# Altium PCB BRD9057A_SiWx917M_4-Layer_ExtSw_REF_DES_A01.PcbDoc (part 1 of 3)
Units mm, origin at the board's own origin, x right, y up, seen from the top; angles counter-clockwise.
Board outline 30 x 45 mm, 4 copper layers (Top Layer, Signal Layer 2, Signal Layer 3, Bottom Layer), stack 1.527 mm thick; 95 components, 97 nets, 386 pads, 413 vias.
Unrouted connection lines stored in the file: 15.
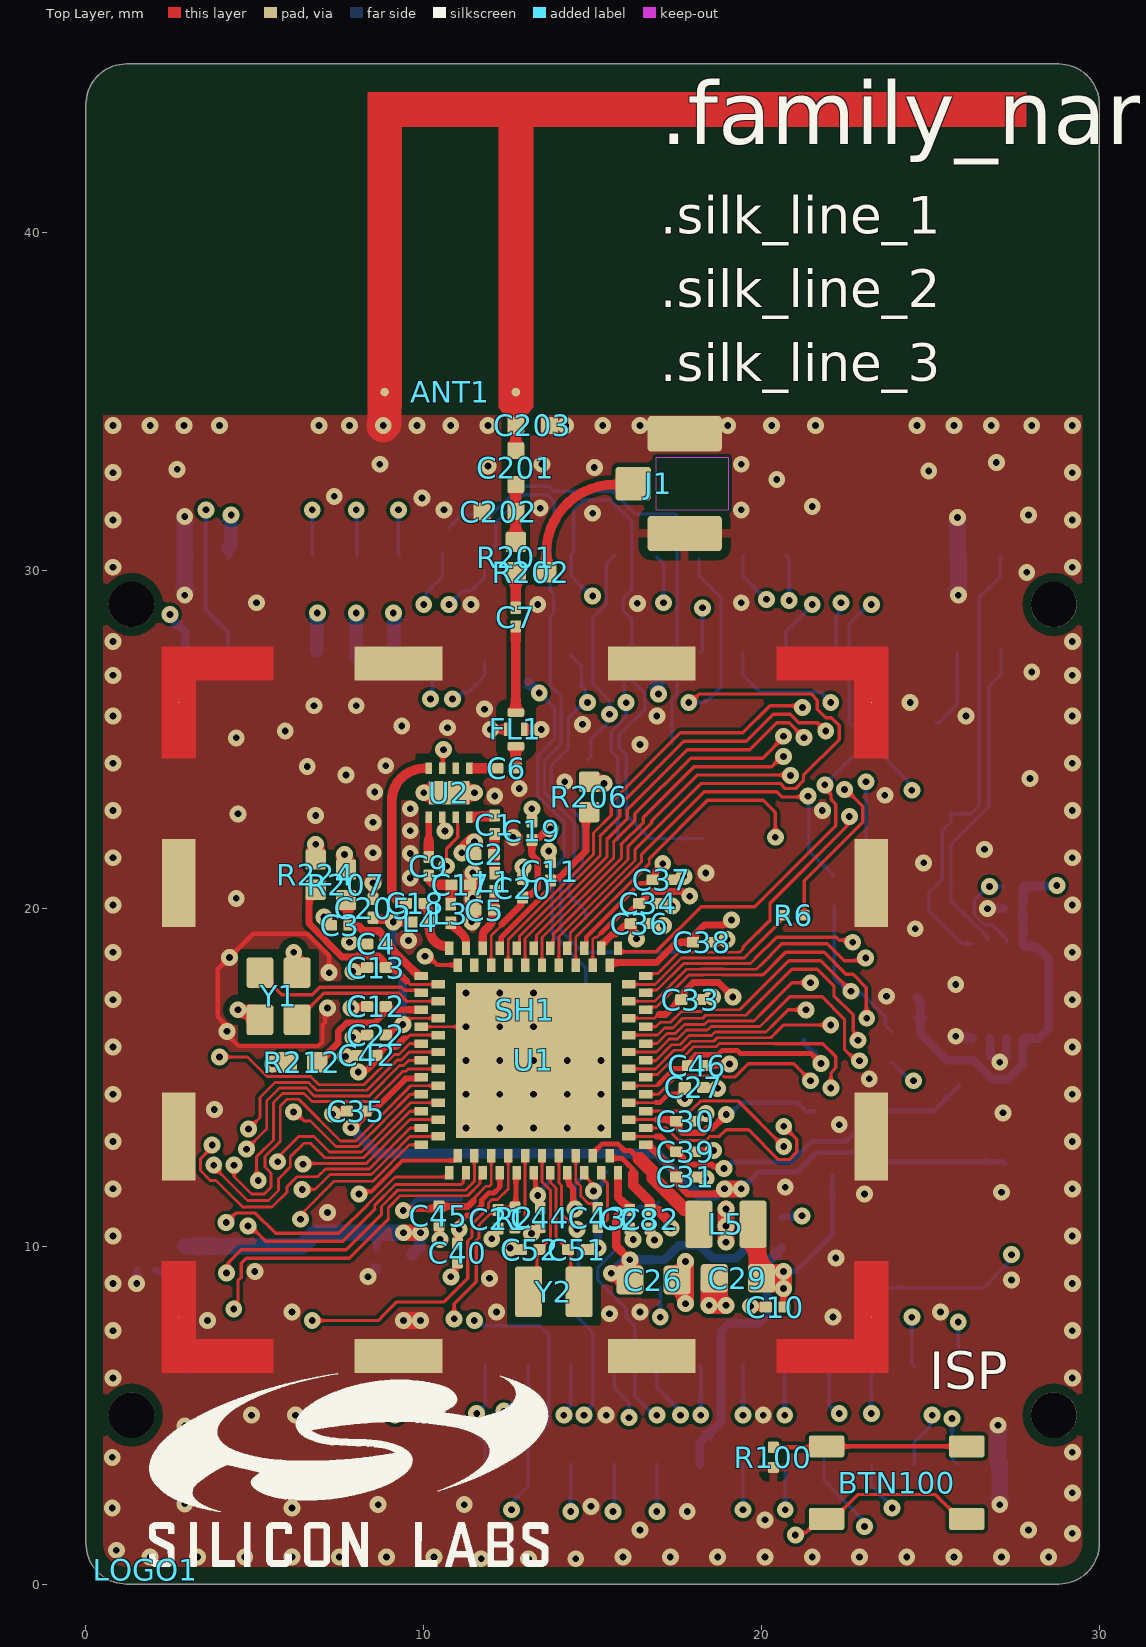
[diagram p0: Top Layer view]
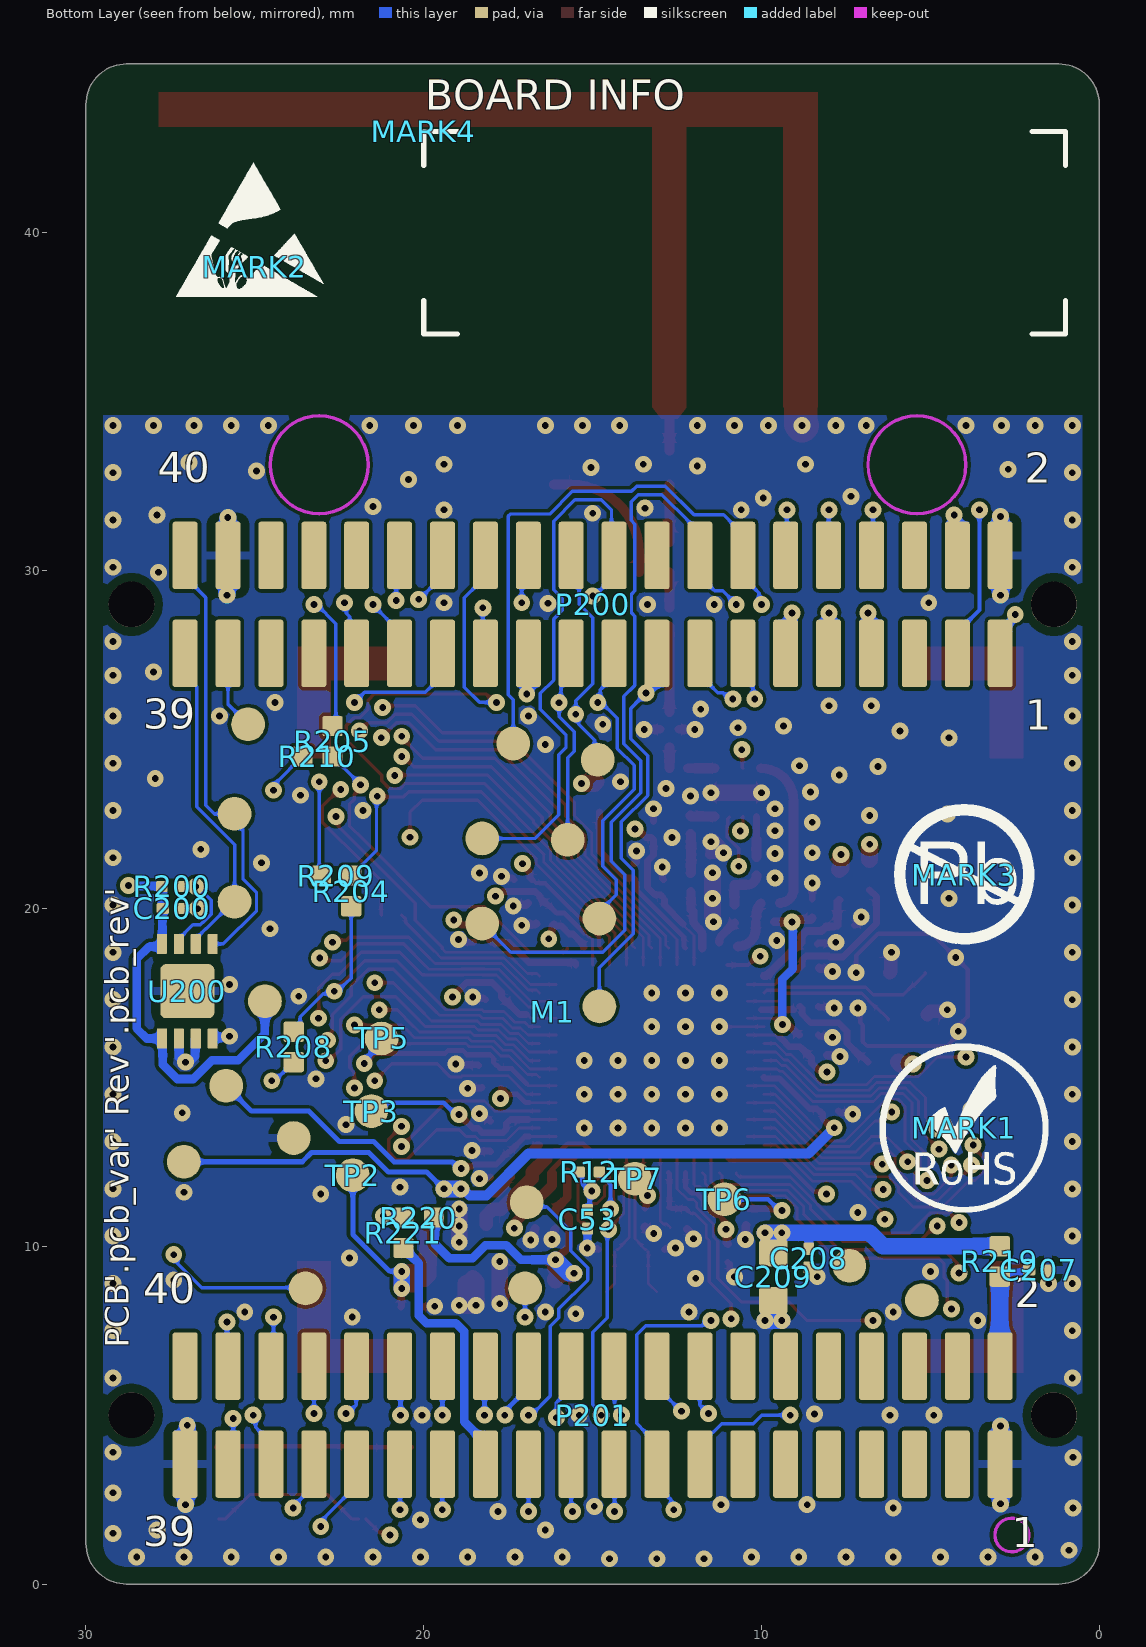
[diagram p1: Bottom Layer view, seen from below]
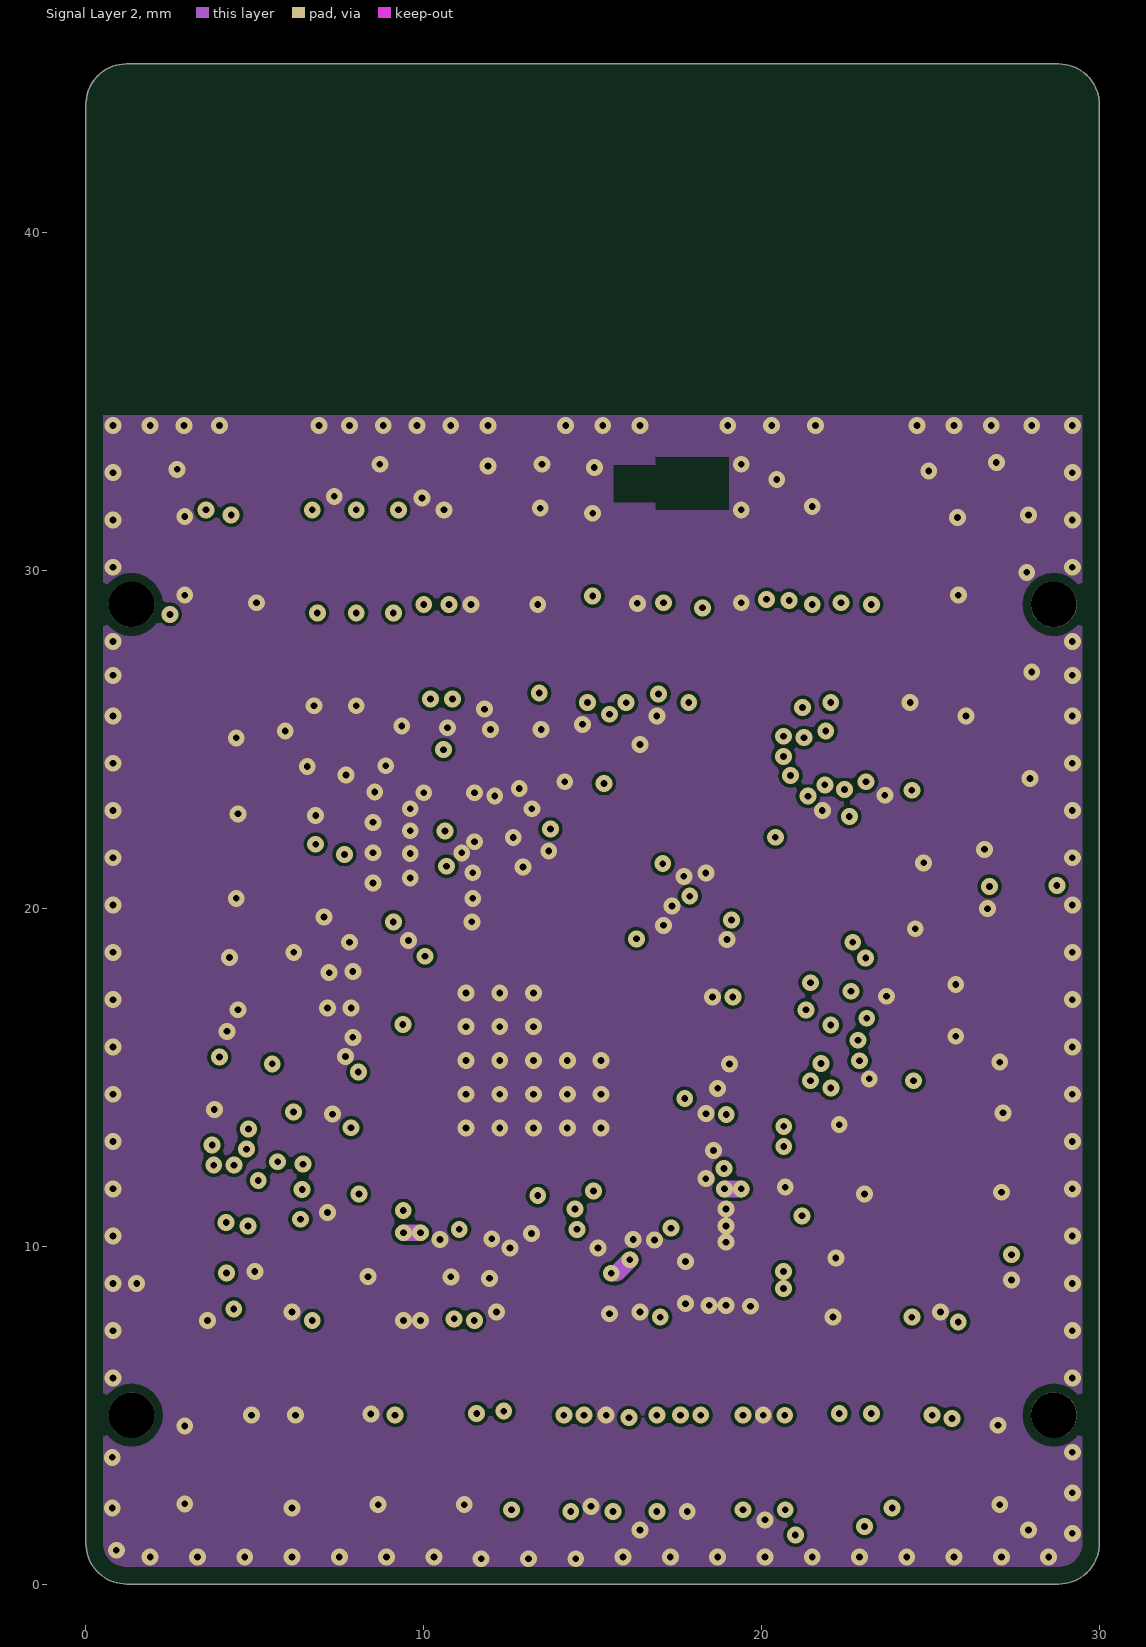
[diagram p2: Signal Layer 2]
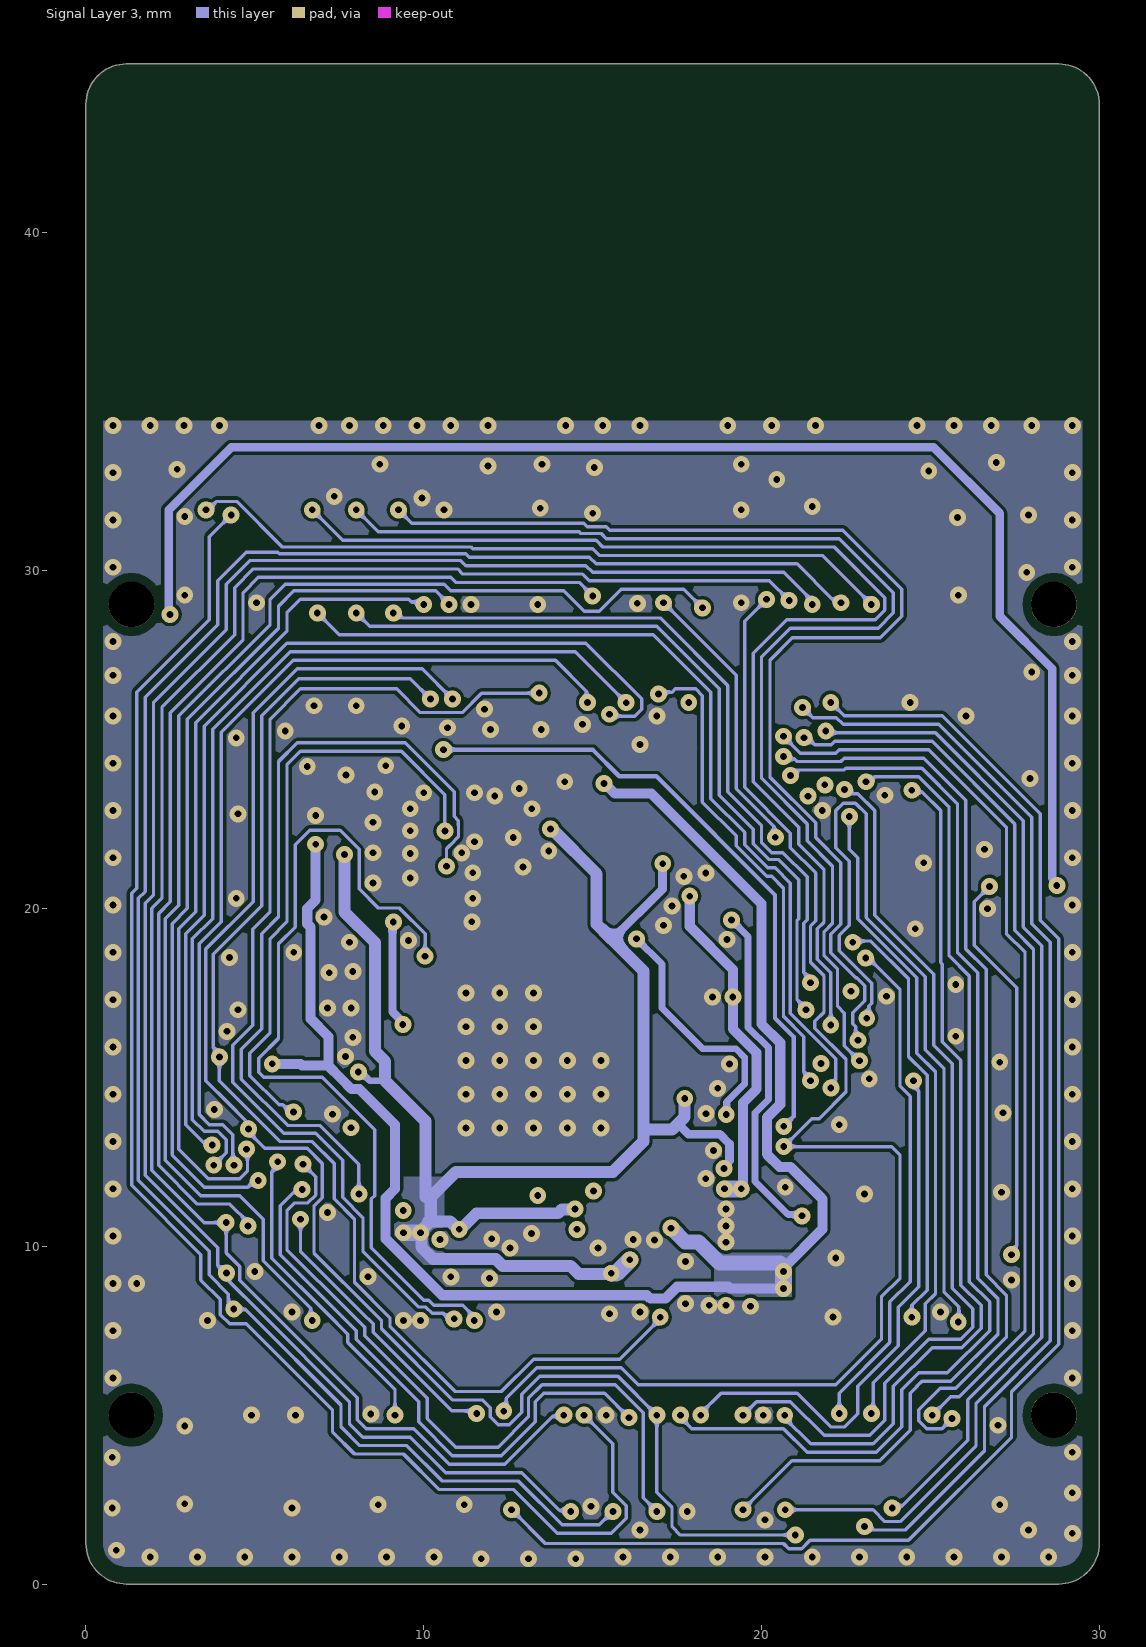
[diagram p3: Signal Layer 3]

## Layer stack, top to bottom
Top Solder: solder mask 0.0102, Solder Resist, Dk 3.5
Top Layer: signal copper 0.035
Dielectric 1: prepreg 0.1785, Dk 4.56
Signal Layer 2: signal copper 0.035
Dielectric 3: core 1.03, Dk 4.6
Signal Layer 3: signal copper 0.035
Dielectric 2: prepreg 0.1785, Dk 4.56
Bottom Layer: signal copper 0.035
Bottom Solder: solder mask 0.0102, Solder Resist, Dk 3.5

## Board outline
0,1.2 0,43.8 cw(c1.2,43.8) 1.2,45 28.8,45 cw(c28.8,43.8) 30,43.8 30,1.2 cw(c28.8,1.2) 28.8,0 1.2,0 cw(c1.2,1.2)

## Design rules (kind name [scope] priority, off if disabled: settings)
AcuteAngle [All] p1: minimum=6.00000000000000E+0001 checktracksonly=FALSE
AssemblyTestPointUsage [All] p1 off:
AssemblyTestpoint [All] p1 off: testpointundercomponent=TRUE minsize=1.016 maxsize=2.54 preferedsize=1.524 minholesize=0 maxholesize=1.016 preferedholesize=0.813 testpointgrid=0.025 usegrid=TRUE gridtolerance=0 allowsidetop=TRUE allowsidebottom=TRUE
BoardOutlineClearance [All] p1: gap=0.5 ignorepadtopadclearanceinfootprint=FALSE
Clearance Clearance_IFA_internal [InComponent('ANT1')] p1: gap=0.1 ignorepadtopadclearanceinfootprint=FALSE except(0: Arc-Fill Arc-Poly Arc-Region Track-Fill Track-Poly Track-Region SMDPad-Fill SMDPad-Poly SMDPad-Region)
Clearance Clearance_RF [InNetClass('50OHM')] p2: gap=0.127 ignorepadtopadclearanceinfootprint=FALSE except(0.1: SMDPad-SMDPad)
Clearance Clearance_NPTH [(ObjectKind = 'Pad') And (Layer = 'MultiLayer') And (PadIsPlated = 'False')] p3: gap=0.254 ignorepadtopadclearanceinfootprint=FALSE except(0: Arc-Hole Track-Hole SMDPad-Hole THPad-Hole Via-Hole Fill-Hole Poly-Hole Region-Hole Text-Hole)
Clearance Clearance_Polygon [InPoly] p4: gap=0.1 ignorepadtopadclearanceinfootprint=FALSE except(0: Arc-Hole Track-Hole SMDPad-Hole THPad-Hole Via-Hole Fill-Hole Poly-Hole Region-Hole Text-Hole)
Clearance Clearance_U1 [WithinRoom('Room_U1_Escape') vs OnLayer('Top Layer')] p5: gap=0.083 ignorepadtopadclearanceinfootprint=FALSE except(0: Arc-Hole Track-Hole SMDPad-Hole THPad-Hole Via-Hole Fill-Hole Poly-Hole Region-Hole Text-Hole)
Clearance Clearance_default [All] p6: gap=0.1 ignorepadtopadclearanceinfootprint=FALSE except(0: Arc-Hole Track-Hole SMDPad-Hole THPad-Hole Via-Hole Fill-Hole Poly-Hole Region-Hole Text-Hole)
ComponentClearance "ComponentClearance - Default - DEFAULT" [All] p1 off: gap=0.152 collisioncheckmode=3 verticalgap=0.254 showdistances=FALSE
FabricationTestPointUsage [All] p1 off: valid=0 allowmultiple=FALSE
FabricationTestpoint [All] p1 off: side=3 testpointundercomponent=TRUE minsize=1.016 maxsize=2.54 preferedsize=1.524 minholesize=0 maxholesize=1.016 preferedholesize=0.813 testpointgrid=0.025 allowsidetop=TRUE allowsidebottom=TRUE usegrid=TRUE gridtolerance=0
FanoutControl Fanout_BGA [IsBGA] p1 off: bgadir=Out bgaviamode=Centered fanoutstyle=Auto fanoutdirection=Alternating viagrid=0.025 // Fanout_BGA (Default Rule)
FanoutControl Fanout_LCC [IsLCC] p2 off: bgadir=Out bgaviamode=Centered fanoutstyle=Auto fanoutdirection=Alternating viagrid=0.025 // Fanout_LCC (Default Rule)
FanoutControl Fanout_SOIC [IsSOIC] p3 off: bgadir=Out bgaviamode=Centered fanoutstyle=Auto fanoutdirection=Alternating viagrid=0.025 // Fanout_SOIC (Default Rule)
FanoutControl Fanout_Small [(CompPinCount < 5)] p4 off: bgadir=Out bgaviamode=Centered fanoutstyle=Auto fanoutdirection=OutThenIn viagrid=0.025 // Fanout_Small (Default Rule)
FanoutControl Fanout_Default [All] p5 off: bgadir=Out bgaviamode=Centered fanoutstyle=Auto fanoutdirection=Alternating viagrid=0.025 // Fanout_Default (Default Rule)
HoleSize [All] p1: absolutevalues=TRUE maxlimit=12.7 minlimit=0.1 maxpercent=80.000 minpercent=20.000
HoleToHoleClearance [All] p1: gap=0.28 allowstackedmicrovias=TRUE
MinimumAnnularRing [All] p1: minimumring=0.15
MinimumSolderMaskSliver MinimumSolderMaskSliver_Components [All vs InComponent('U1')or InComponent('U200')or InComponent('U201')or InComponent('U2')  or InComponent('FL1')] p1: minsoldermaskwidth=0
MinimumSolderMaskSliver MinimumSolderMaskSliver_Foorprints [HasFootprint('C0201_GM') or HasFootprint('R0201') or HasFootprint('COIL_0201_GM')] p2: minsoldermaskwidth=0
MinimumSolderMaskSliver [All] p3: minsoldermaskwidth=0.1
PlaneClearance [All] p1 off: clearance=0.508
PlaneConnect [All] p1 off: planeconnectstyle=Relief reliefexpansion=0.508 reliefentries=4 reliefconductorwidth=0.254 reliefairgap=0.254
PolygonConnect PolygonConnect_P1 [InComponent('P1')] p1: connectstyle=Relief reliefconductorwidth=0.5 reliefentries=4 polygonreliefangle="90 Angle" airgapwidth=0.254
PolygonConnect PolygonConnect_Shield [InComponent('SH1')] p2: connectstyle=Direct reliefconductorwidth=0.254 reliefentries=4 polygonreliefangle="90 Angle" airgapwidth=0.254
PolygonConnect PolygonConnect_50OHM_Components [InPadClass('50OHM_Component_GND_Pads')] p3: connectstyle=Direct reliefconductorwidth=0.254 reliefentries=4 polygonreliefangle="90 Angle" airgapwidth=0.254
PolygonConnect [All] p4: thpad.connectstyle=Relief thpad.reliefconductorwidth=0.254 thpad.reliefentries=4 thpad.polygonreliefangle="90 Angle" thpad.airgapwidth=0.254 smdpad.connectstyle=Relief smdpad.reliefconductorwidth=0.254 smdpad.reliefentries=4 smdpad.polygonreliefangle="90 Angle" smdpad.airgapwidth=0.254 via.connectstyle=Direct via.reliefconductorwidth=0.406 via.reliefentries=4 via.polygonreliefangle="90 Angle" via.airgapwidth=0.254
RoomDefinition Room_U1_Escape [InComponentClass('Room_U1_Escape')] p1: confinementstyle=ConfineIn formatcopy=TRUE lockcomponents=FALSE outline 4.205,24.759 21.78,24.759 21.78,8.014 4.205,8.014
RoutingCorners [All] p1: cornerstyle=45-Degree minsetback=0.254 maxsetback=2.54
RoutingLayers "RoutingLayers - Default - DEFAULT" [All] p1: top layer_v5=TRUE mid layer 1_v5=TRUE mid layer 4_v5=TRUE bottom layer_v5=TRUE
RoutingPriority "RoutingPriority - Default - DEFAULT" [All] p1: routingpriority=1
RoutingTopology "Default Routing Topology" [All] p1: topology=Shortest
RoutingVias "Via - DEFAULT" [All] p1: holewidth=0.2 width=0.5 viastyle="Through Hole" minholewidth=0.2 minwidth=0.5 maxholewidth=6.3 maxwidth=6.6
ShortCircuit ShortCircuit_ANT [InNet('NetANT1_1') vs InNet('GND')] p1: allowed=TRUE
ShortCircuit [All] p2: allowed=FALSE
SilkToSilkClearance [All] p1: silktosilkclearance=0.14
SilkToSolderMaskClearance [All] p1: minsilkscreentomaskgap=0.15 clearancetoexposedcopper=FALSE
SolderMaskExpansion [All] p1: expansion=0.051 istentingtop=FALSE
UnConnectedPin [All] p1:
UnRoutedNet [All] p1: checkbadconnections=TRUE
Width Width_RF [InNetClass('50OHM')] p1: maxlimit=0.635 minlimit=0.124 preferedwidth=0.457 toplayer_maxwidth=0.457 toplayer_prefwidth=0.29 midlayer1_minwidth=0.127 midlayer1_prefwidth=0.127 midlayer4_minwidth=0.127 midlayer4_prefwidth=0.127 minimp=50.000000 maximp=50.000000 favimp=50.000000
Width Width_U1 [All] p2: maxlimit=5.08 minlimit=0.083 preferedwidth=0.254 midlayer1_minwidth=0.1 midlayer4_minwidth=0.1 bottomlayer_minwidth=0.1 minimp=50.000000 maximp=50.000000 favimp=50.000000
Width [All] p3: maxlimit=5.08 minlimit=0.1 preferedwidth=0.125 minimp=50.000000 maximp=50.000000 favimp=50.000000
7 further rules are at their usual default settings.

## Classes and differential pairs
pad class Coaxial_Connector: FL1-1 FL1-3 J1-1 J1-2
component class "Page 3": C21 C26 C28 C29 C30 C31 C32 C33 C34 C35 C36 C39 C43 C44 C45 C46 C51 C52 C53 L5 R2 R12 TP2 TP3 TP5 TP6 TP7 Y2
pad class 50OHM_Component_GND_Pads: C5-1 C17-1 FL1-2 FL1-4 J1-3 J1-4 J1-5 J1-6 SH1-1 SH1-2 SH1-3 SH1-4 SH1-5 SH1-6 SH1-7 SH1-8 SH1-9 SH1-10 SH1-11 SH1-12 SH1-13 SH1-14 SH1-15 SH1-16
net class 50OHM: NetANT1_1 NetC1_1 NetC1_2 NetC6_1 NetC6_2 NetC7_1 NetC7_2 NetC9_1 NetC9_2 NetC18_1 NetC18_2 NetC201_1 NetJ1_1
component class "Page 4": BTN100 C27 C37 C38 C40 C42 C124 R6 R100 R103 R204 R205 R208 R209 R210 R220 R221 R? U1 U100 X2
component class "Page 2": ANT1 C1 C2 C3 C4 C5 C6 C7 C9 C10 C11 C12 C13 C17 C18 C19 C20 C22 C201 C202 C203 C205 FL1 J1 J4 L1 L3 L4 R201 R202 R206 R207 R212 R224 SH1 U2 X1 Y1
component class "Page 5": C200 C207 C208 C209 CCC LOGO1 M1 MARK1 MARK2 MARK3 MARK4 P200 P201 R200 R219 U200
pad class NPTH: P200-M1 P200-M2 P201-M1 P201-M2

## Components (designator, comment, footprint, x,y, rotation, side; value= is the part's Value field where it differs from the comment)
ANT1 "PATCH ANT INVERTED-F" EM358x_INVERTED_F 8.339,34.835 r0 top locked value=19.5mm
BTN100 "PTS810 SJM 250 SMTR LFS" SW_PTS810SJM250SMTRLFS 24,3 r0 top value=PTS810
C1 "GJM0335C1E8R2BB01" C0201_GM 12.1,22.475 r90 top value=8.2pF
C2 "TBD CAP 0201" C0201_GM 11.8,21.6 r180 top value=0201
C3 "CAP CER 0201 X5R 1uF 16V 20%" C0201_GM 7.525,19.5 r0 top value=1µF
C4 "CAP CER 0201 X5R 100nF 16V 10%" C0201_GM 8.6,18.95 r0 top value=100nF
C5 "GRM0335C1HR70WA01" C0201_GM 11.8,19.95 r0 top value=0.7pF
C6 "GRM0335C1H180GA01" C0201_GM 12.45,24.15 r0 top value=18pF
C7 "GRM0335C1H180GA01" C0201_GM 12.725,28.625 r90 top value=18pF
C9 "GJM0335C1E8R2BB01" C0201_GM 10.15,21.25 r90 top value=8.2pF
C10 "CAP CER 0201 X5R 1uF 16V 20%" C0201_GM 20.4,8.2 r0 top value=1µF
C11 "CAP CER 0201 X5R 100nF 16V 10%" C0201_GM 13.75,21.1 r270 top value=100nF
C12 "CAP CER 0201 X5R 100nF 16V 10%" C0201_GM 8.6,17.1 r0 top value=100nF
C13 "CAP CER 0201 X5R 100nF 16V 10%" C0201_GM 8.6,18.25 r0 top value=100nF
C17 "GRM0335C1HR90WA01" C0201_GM 11.1,20.7 r180 top value=0.9pF
C18 "GJM0335C1E8R2BB01" C0201_GM 9.75,20.15 r180 top value=8.2pF
C19 "CAP CER 0201 X5R 1uF 16V 20%" C0201_GM 13.2,22.3 r270 top value=1µF
C20 "CAP CER 0201 X5R 100nF 16V 10%" C0201_GM 12.925,20.6 r270 top value=100nF
C21 "CAP CER 0201 X5R 1nF 16V 10%" C0201_GM 12.2,10.8 r90 top value=1nF
C22 "CAP CER 0201 X5R 1uF 16V 20%" C0201_GM 8.6,16.25 r0 top value=1µF
C26 "CAP CER 0603 X5R 10uF 16V 10%" C0603 16.8,9 r180 top value=10µF
C27 "CAP CER 0201 X5R 100nF 16V 10%" C0201_GM 18,14.7 r180 top value=100nF
C28 "CAP CER 0201 X5R 100nF 16V 10%" C0201_GM 16.1,10.8 r90 top value=100nF
C29 "CAP CER 0603 X5R 10uF 16V 10%" C0603 19.3,9.05 r0 top value=10µF
C30 "CAP CER 0201 X5R 1uF 16V 20%" C0201_GM 17.75,13.7 r180 top value=1µF
C31 "CAP CER 0201 X5R 1uF 16V 20%" C0201_GM 17.75,12.05 r180 top value=1µF
C32 "CAP CER 0201 X5R 100nF 16V 10%" C0201_GM 16.7,10.8 r90 top value=100nF
C33 "CAP CER 0201 X5R 100nF 16V 10%" C0201_GM 17.9,17.3 r180 top value=100nF
C34 "CAP CER 0201 X5R 100nF 16V 10%" C0201_GM 16.65,20.15 r180 top value=100nF
C35 "CAP CER 0201 X5R 100nF 16V 10%" C0201_GM 8,14 r0 top value=100nF
C36 "CAP CER 0201 X5R 100nF 16V 10%" C0201_GM 16.4,19.55 r180 top value=100nF
C37 "CAP CER 0201 X5R 100nF 16V 10%" C0201_GM 17.05,20.85 r180 top value=100nF
C38 "CAP CER 0201 X5R 100nF 16V 10%" C0201_GM 18.25,19 r180 top value=100nF
C39 "CAP CER 0201 X5R 1uF 16V 20%" C0201_GM 17.75,12.8 r180 top value=1µF
C40 "CAP CER 0201 X5R 1uF 16V 20%" C0201_GM 11,9.8 r90 top value=1µF
C42 "CAP CER 0201 X5R 100nF 16V 10%" C0201_GM 8.325,15.65 r0 top value=100nF
C43 "CAP CER 0201 X5R 10nF 16V 10%" C0201_GM 15.15,10.85 r270 top value=10nF
C44 "CAP CER 0201 X5R 1uF 16V 20%" C0201_GM 13.45,10.85 r90 top value=1µF
C45 "CAP CER 0201 X5R 2.2uF 10V 20%" C0201_GM 10.45,10.9 r90 top value=2.2µF
C46 "CAP CER 0201 X5R 1uF 16V 20%" C0201_GM 18.1,15.35 r180 top value=1µF
C51 "GRM0335C1H120FA01" C0201_GM 14.55,9.9 r180 top value=12pF
C52 "GRM0335C1H120FA01" C0201_GM 13.15,9.9 r0 top value=12pF
C53 "CAP CER 0201 X5R 10nF 16V 10%" C0201_GM 15.15,10.8 r90 bottom value=10nF
C200 "CAP CER 0201 X5R 100nF 16V 10%" C0201_GM 27.45,20 r180 bottom value=100nF
C201 "TBD CAP 0402" C0402 12.725,33.05 r90 top value=0R
C202 "TBD CAP 0402" C0402 12.225,31.75 r0 top value=0402
C203 "TBD CAP 0402" C0402 13.225,34.3 r180 top value=0402
C205 "CAP CER 0201 C0G 4pF 25V 0.05pF" C0201_GM 8.5,20 r270 top value=4pF
C207 "CAP CER 0201 X5R 100nF 16V 10%" C0201_GM 1.8,9.3 r0 bottom value=100nF
C208 "CAP CER 0201 X5R 100nF 16V 10%" C0201_GM 8.6,9.65 r90 bottom value=100nF
C209 "CAP CER 0603 X5R 10uF 16V 10%" C0603 9.65,9.1 r270 bottom value=10µF
FL1 "LTB-1005-2G4H6-A4-PS" BPF_LTB-1005-2G4H6-A2-PS_GM 12.725,25.3 r90 top value=2.45GHz
J1 "U.FL-R-SMT-1" KLS1-IPEX_2.6x2.6 17.725,32.575 r180 top
L1 "LQP03HQ3N5B02" COIL_0201_GM 12.1,20.775 r90 top value=3.5nH
L3 "LQP03HQ4N0B02D" COIL_0201_GM 10.8,19.85 r90 top value=4nH
L4 "LQP03HQ6N2H02" COIL_0201_GM 9.9,19.6 r0 top value=6.2nH
L5 "DFE201210U-1R0M#" INDC2012X100N_DFE 18.95,10.65 r0 top value=1µH
LOGO1 "LOGO SILABS 12MM" LOGO_SILABS_W12.0_SILK 1.775,0.425 r0 top value="SILABS 12MM"
M1 "RB TEST FIXTURE PATTERN" "RB TEST FIXTURE PATTERN" 16.176,16.926 r0 top locked value="TEST FIXTURE PATTERN"
MARK1 "LOGO RoHS 5MM" "LOGO RoHS 5MM" 4,13.5 r180 bottom value=RoHS
MARK2 "LOGO ESD 4.5MM" "LOGO ESD 4.5MM" 25,39 r180 bottom value=ESD
MARK3 "LOGO PBF 2MM" "LOGO PBF 2MM" 4,21 r180 bottom value=Pb-free
MARK4 "BOARD INFO FRAME 19MM" "BOARD INFO FRAME SILK-Footprint-1" 20,43 r180 bottom value="BOARD INFO FRAME"
P200 "2344-220MS3CUNR8" SAMTEC_SFC-120-T2-L-D-A 15,29 r0 bottom locked
P201 "2344-220MS3CUNR8" SAMTEC_SFC-120-T2-L-D-A 15,5 r0 bottom locked
R2 "RES 0201 10K 1/20W 1% 200ppm" R0201 12.7,10.85 r90 top value=10k
R6 "RES 0201 33R 1/20W 1% 200ppm" R0201 20.95,19.8 r0 top value=33
R12 "RES 0201 100K 1/20W 1% 200ppm" R0201 15.1,12.2 r180 bottom value=100k
R100 "RES 0201 100R 1/20W 1% 200ppm" R0201 20.35,3.75 r270 top value=100
R200 "RES 0201 10K 1/20W 1% 200ppm" R0201 27.45,20.65 r0 bottom value=10k
R201 "RES 0402 0R" R0402 12.725,30.4 r90 top value=0
R202 "RES 0402 0R" R0402 13.175,29.95 r0 top value=0
R204 "RES 0402 0R" R0402 22.146,20.514 r90 bottom value=0
R205 "RES 0402 0R" R0402 22.7,24.95 r90 bottom value=0
R206 "RC0402FR-070RL" R0402 14.9,23.3 r270 top value=0
R207 "RC0402FR-070RL" R0402 7.7,20.7 r270 top value=0
R208 "RES 0402 0R" R0402 23.85,15.9 r270 bottom value=0
R209 "RES 0402 0R" R0402 22.596,20.964 r0 bottom value=0
R210 "RES 0402 0R" R0402 23.15,24.5 r0 bottom value=0
R212 "RC0402FR-070RL" R0402 6.4,15.45 r0 top value=0
R219 "RES 0402 0R" R0402 2.95,9.55 r90 bottom value=0
R220 "RES 0402 0R" R0402 20.15,10.85 r0 bottom value=0
R221 "RES 0402 0R" R0402 20.6,10.4 r90 bottom value=0
R224 "RC0402FR-070RL" R0402 6.8,21 r270 top value=0
SH1 "36103205" WURTH_36103205_No_Paste 13,17 r0 top locked value=21x21x3
TP2 "TEST POINT SMD 1MM" TP_1.0_SMD 22.1,12.1 r90 bottom locked
TP3 "TEST POINT SMD 1MM" TP_1.0_SMD 21.55,14 r90 bottom locked value=1MM
TP5 "TEST POINT SMD 1MM" TP_1.0_SMD 21.25,16.15 r90 bottom locked value=1MM
TP6 "TEST POINT SMD 1MM" TP_1.0_SMD 11.098,11.39 r90 bottom locked value=1MM
TP7 "TEST POINT SMD 1MM" TP_1.0_SMD 13.75,12 r90 bottom locked value=1MM
U1 "SiWG917M111MGTBAR" QFN84_SI_SiWx917_A1 13.25,15.5 r270 top value=SiWG917
U2 "HWS520" USON8L_1.5X1.5MM_GM 10.75,23.425 r180 top
U200 "M24C02-FMC6TG" DFN50P300X200X60_HS-9N_GM 27,17.55 r90 bottom value=M24C02
Y1 "8Y40070013" XTAL200X160X50 5.7,17.4 r270 top value=40MHz
Y2 "CM8V-T1A-32.768KHZ-7PF-20PPM-TA-QC" XTAL200X120X60-2N 13.85,8.65 r0 top value=32.768kHz

## Footprints (in the part's own frame and the unit in brackets; to place one, negate y for a bottom-side part, rotate by r counter-clockwise, add the part's x,y. Pads: shape width x height; smd on the part's side, far side on the other; paste and mask are expansions set on the pad)
"BOARD INFO FRAME SILK-Footprint-1" [mm]
  silkscreen extent 0,-6 19,0
BPF_LTB-1005-2G4H6-A2-PS_GM [mm] "gang mask added"
  rrect40% 0.25x0.5 smd: 1(-0.5,0) 3(0.5,0)
  rrect25% 0.4x0.2 smd: 2(0,-0.25) 4(0,0.25)
  body extent -0.5,-0.25 0.5,0.25, height 0.41
C0201_GM [mm] "Capacitor, 9291, HiDens (170502), GANG Mask added as SM web width is less than 0.1mm"
  rrect25% 0.36x0.32 smd paste-0.015: 1(-0.275,0) 2(0.275,0)
  Top Layer pour cut-out: -0.075,-0.2 -0.075,0.2 0.075,0.2 0.075,-0.2
  body extent -0.32,-0.13 0.32,0.13, height 0.3
C0402 [mm] "Chip Capacitor, 2-Leads, Body 1.0x0.5mm, IPC High Density (190308)"
  rrect20% 0.5x0.5 smd mask+0.051: 1(-0.5,0) 2(0.5,0)
  Top Layer pour cut-out: -0.225,-0.3 -0.225,0.3 0.225,0.3 0.225,-0.3
  body extent -0.5,-0.25 0.5,0.25, height 0.6
C0603 [mm] "Capacitor, 0603, HiDens (190130)"
  rrect25% 0.8x0.85 smd: 1(-0.7,0) 2(0.7,0)
  Top Layer pour cut-out: -0.275,-0.55 -0.275,0.55 0.275,0.55 0.275,-0.55
  body extent -0.88,-0.48 0.87,0.48, height 0.95
COIL_0201_GM [mm] "Inductor, 0201, High Density (C), Gang soldermask added"
  rrect10% 0.37x0.32 smd: 1(-0.27,0) 2(0.27,0)
  body extent -0.32,-0.17 0.32,0.17, height 0.33
DFN50P300X200X60_HS-9N_GM [mm] "UFDFPN8, 8-Leads, Body 3.00x2.00mm, Pitch 0.50mm, DFN8, gang solder mask added"
  rrect20% 0.6x0.3 smd: 1(-1.4,0.75) 2(-1.4,0.25) 3(-1.4,-0.25) 4(-1.4,-0.75) 5(1.4,-0.75) 6(1.4,-0.25) 7(1.4,0.25) 8(1.4,0.75)
  rrect20% 1.6x1.6 smd: 9(0,0)
  body extent -1.5,-1 1.5,1, height 0.6
EM358x_INVERTED_F [mil] "F-ANTENNA INVERSE 19.5 mm"
  round 10 smd paste-10 mask-10: 1(172.68,17.72) 2(19.68,17.85)
  Top Layer region: 0,367.2 767.72,367.2 767.72,327.07 193,327.07 193,0 153,0 153,327.07 40,327.07 40,0 20,0 0,0
INDC2012X100N_DFE [mm] "Chip Inductor, 0805(2012), Height 1mm, DFE2012"
  rrect20% 0.8x1.4 smd: 1(-0.8,0) 2(0.8,0)
  body extent -1,-0.6 1,0.6, height 1
KLS1-IPEX_2.6x2.6 [mm] "RF Connector I-PEX I 2.6x2.6x1.25mm, Hirose-U.FL-R-SMT-1"
  rrect20% 1.05x1 smd: 1(1.525,0)
  rrect20% 2.2x1.05 smd: 2(0,1.475) 3(0,-1.475)
  Top Layer keep-out region: -1.299,0.775 -1.299,-0.774 0.851,-0.774 0.851,0.775
  body extent -1.57,-1.49 1.53,1.51, height 1.25
"LOGO ESD 4.5MM" [mm] "ESD logo printed on silkscreen"
  silkscreen extent -2.33,-0.89 2.03,3.08
"LOGO PBF 2MM" [mm] "Pb-free logo printed on silkscreen"
  silkscreen extent -2.08,-2.06 2.07,2.09
"LOGO RoHS 5MM" [mm] "RoHS logo printed on silkscreen"
  silkscreen extent -2.5,-2.5 2.49,2.5
LOGO_SILABS_W12.0_SILK [mm] "LOGO_SILABS_W12.0 SILKSCREEN ONLY"
  silkscreen extent 0.09,0.09 11.91,5.81
QFN84_SI_SiWx917_A1 [mm]
  rect 0.4x0.25 smd paste-0.05: A1(-3.325,2.5) A2(-3.325,2) A3(-3.325,1.5) A4(-3.325,1) A5(-3.325,0.5) A6(-3.325,0) A7(-3.325,-0.5) A8(-3.325,-1) A9(-3.325,-1.5) A10(-3.325,-2) A11(-3.325,-2.5) A23(3.325,-2.5) A24(3.325,-2) A25(3.325,-1.5) A26(3.325,-1) A27(3.325,-0.5) A28(3.325,0) A29(3.325,0.5) A30(3.325,1) A31(3.325,1.5) A32(3.325,2) A33(3.325,2.5) B1(-2.825,2.25) B2(-2.825,1.75) B3(-2.825,1.25) B4(-2.825,0.75) B5(-2.825,0.25) B6(-2.825,-0.25) B7(-2.825,-0.75) B8(-2.825,-1.25) B9(-2.825,-1.75) B10(-2.825,-2.25) B21(2.825,-2.25) B22(2.825,-1.75) B23(2.825,-1.25) B24(2.825,-0.75) B25(2.825,-0.25) B26(2.825,0.25) B27(2.825,0.75) B28(2.825,1.25) B29(2.825,1.75) B30(2.825,2.25)
  rect 0.25x0.4 smd paste-0.05: A12(-2.5,-3.325) A13(-2,-3.325) A14(-1.5,-3.325) A15(-1,-3.325) A16(-0.5,-3.325) A17(0,-3.325) A18(0.5,-3.325) A19(1,-3.325) A20(1.5,-3.325) A21(2,-3.325) A22(2.5,-3.325) A34(2.5,3.325) A35(2,3.325) A36(1.5,3.325) A37(1,3.325) A38(0.5,3.325) A39(0,3.325) A40(-0.5,3.325) A41(-1,3.325) A42(-1.5,3.325) A43(-2,3.325) A44(-2.5,3.325) B11(-2.25,-2.825) B12(-1.75,-2.825) B13(-1.25,-2.825) B14(-0.75,-2.825) B15(-0.25,-2.825) B16(0.25,-2.825) B17(0.75,-2.825) B18(1.25,-2.825) B19(1.75,-2.825) B20(2.25,-2.825) B31(2.25,2.825) B32(1.75,2.825) B33(1.25,2.825) B34(0.75,2.825) B35(0.25,2.825) B36(-0.25,2.825) B37(-0.75,2.825) B38(-1.25,2.825) B39(-1.75,2.825) B40(-2.25,2.825)
  rect 4.6x4.6 smd paste-4.7: B41(0,0)
  body extent -3.5,-3.5 3.5,3.5, height 0.9
R0201 [mm] "Resistor (Chip2PinSM127P600-8N) (170921)"
  rrect25% 0.34x0.32 smd: 1(-0.3,0) 2(0.3,0)
  Top Layer pour cut-out: -0.1,-0.2 -0.1,0.2 0.1,0.2 0.1,-0.2
  body extent -0.32,-0.13 0.32,0.13, height 0.3
R0402 [mm] "Chip Resistor, 2-Leads, Body 1.0x0.5mm, HiDens (190308)"
  rrect20% 0.6x0.6 smd mask+0.051: 1(-0.45,0) 2(0.45,0)
  Top Layer pour cut-out: -0.125,-0.3 -0.125,0.3 0.125,0.3 0.125,-0.3
  body extent -0.5,-0.25 0.5,0.25, height 0.6
"RB TEST FIXTURE PATTERN" [mm] "Test point pattern for RADIO BOARDS"
  round 1 smd far side paste-1: TPJ1(0.824,-8.174) TPJ2(1.175,7.955) TPJ3(0.773,-5.626) TPJ4(2.094,2.626) TPJ5(-1.375,2.776) TPJ6(2.094,5.146) TPJ7(-0.436,5.105) TPJ8(-1.325,7.475) TPJ9(10.926,-4.425) TPJ10(8.526,0.325) TPJ11(9.674,-2.174) TPJ12(9.023,8.524) TPJ13(7.675,-3.724) TPJ14(9.425,3.274) TPJ15(9.425,5.875) TPJ16(7.324,-8.174) TPJ17(-1.375,0.175) TPJ18(-8.774,-7.506) TPJ19(-10.926,-8.524)
  Bottom Layer keep-out circle w0.1: c-13.585,-15.474 r0.5
  Bottom Layer keep-out circle w0.1: c6.92,16.21 r1.45
  Bottom Layer keep-out circle w0.1: c-10.776,16.209 r1.45
SAMTEC_SFC-120-T2-L-D-A [mm]
  rrect20% 0.74x2 smd mask+0.05: 1(-12.065,1.45) 2(-12.065,-1.45) 3(-10.795,1.45) 4(-10.795,-1.45) 5(-9.525,1.45) 6(-9.525,-1.45) 7(-8.255,1.45) 8(-8.255,-1.45) 9(-6.985,1.45) 10(-6.985,-1.45) 11(-5.715,1.45) 12(-5.715,-1.45) 13(-4.445,1.45) 14(-4.445,-1.45) 15(-3.175,1.45) 16(-3.175,-1.45) 17(-1.905,1.45) 18(-1.905,-1.45) 19(-0.635,1.45) 20(-0.635,-1.45) 21(0.635,1.45) 22(0.635,-1.45) 23(1.905,1.45) 24(1.905,-1.45) 25(3.175,1.45) 26(3.175,-1.45) 27(4.445,1.45) 28(4.445,-1.45) 29(5.715,1.45) 30(5.715,-1.45) 31(6.985,1.45) 32(6.985,-1.45) 33(8.255,1.45) 34(8.255,-1.45) 35(9.525,1.45) 36(9.525,-1.45) 37(10.795,1.45) 38(10.795,-1.45) 39(12.065,1.45) 40(12.065,-1.45)
  round 1.35 hole 1.35 unplated paste-2539.97 mask-5.563: M1(13.652,0) M2(-13.652,0)
  body extent -14.65,-1.58 14.65,2.25, height 4.57
SW_PTS810SJM250SMTRLFS [mm] "Switch C&K PTS810, Body 4.2x3.2mm, 4-pins"
  rrect20% 1.05x0.65 smd: 1(-2.075,1.075) 2(2.075,1.075) 3(-2.075,-1.075) 4(2.075,-1.075)
  body extent -2.29,-1.6 2.29,1.6, height 2.5
TP_1.0_SMD [mm] "Test Point, 1.0 mm, SMD (170509)"
  round 1 smd paste-0.501: 1(0,0)
  body extent -0.5,-0.5 0.5,0.5, height 0.04
USON8L_1.5X1.5MM_GM [mm] "Bottom solder mask opening added to match EVK boards, gang mask added"
  rrect25% 0.2x0.35 smd: 1(-0.6,-0.725) 2(-0.2,-0.725) 3(0.2,-0.725) 4(0.6,-0.725) 5(0.6,0.725) 6(0.2,0.725) 7(-0.2,0.725) 8(-0.6,0.725)
  rect 1.2x0.7 smd: 9(0,0)
  body extent -0.77,-0.82 0.77,0.82, height 0.4
WURTH_36103205_No_Paste [mm] "RF Shield Frame 0.827\" (21.00mm) X 0.827\" (21.00mm) Surface Mountq"
  rect 1x2.6 smd paste-10: 1(-10.25,3.75) 2(-10.25,-3.75) 7(10.25,-3.75) 8(10.25,3.75)
  round 0.025 smd paste-1: 3(-10.25,-9.1) 6(10.25,-9.1) 9(10.25,9.1) 12(-10.25,9.1)
  rect 2.6x1 smd paste-10: 4(-3.75,-10.25) 5(3.75,-10.25) 10(3.75,10.25) 11(-3.75,10.25)
  Top Layer region: -10.75,-7.45 -10.75,-10.75 -7.45,-10.75 -7.45,-9.75 -9.75,-9.75 -9.75,-7.45
  Top Layer region: 9.75,7.45 9.75,9.75 7.45,9.75 7.45,10.75 10.75,10.75 10.75,7.45
  Top Layer region: 7.45,-9.75 9.75,-9.75 9.75,-7.45 10.75,-7.45 10.75,-10.75 7.45,-10.75
  Top Layer region: -9.75,7.45 -9.75,9.75 -7.45,9.75 -7.45,10.75 -10.75,10.75 -10.75,7.45
  body extent -10.5,-10.5 10.5,10.5, height 3.5
XTAL200X120X60-2N [mm] "Crystal Oscillator, 2-Leads, Body Length 2.0mm, Body Width 1.20mm, Heigth 0.60mm"
  rrect20% 0.8x1.5 smd: 1(-0.75,0) 2(0.75,0)
  body extent -1,-0.6 1,0.6, height 0.6
XTAL200X160X50 [mm] "TXC Crystal, 4 Leads,  2.0mm X 1.6mm. Height 0.5mm"
  rrect20% 0.9x0.8 smd: 1(-0.7,-0.55) 2(0.7,-0.55) 3(0.7,0.55) 4(-0.7,0.55)
  body extent -1,-0.8 1,0.8, height 0.5

## Part data
ANT1: library part CMP-000-00029-A.03, "ANT PATCH 19.5MM INVERTED-F", Additional Search Tag=Surface, Mount=N/A, SubCategory Tag=ANT
BTN100: library part CMP-185-00008-A.03, "Tactile Switch SPST-NO 0.05A 16V", Manufacturer=C&K, Max Operating Temp=85°C, Min Operating Temp=-40°C, Package="4.2mm X 3.2mm", Manufacturer PN="PTS810 SJM 250 SMTR LFS", Mount=SMD, RoHS=Compliant, SubCategory Tag=Tactile
C1 C9 C18: library part CMP-120-00147-A.02, "CAP CER 0201 C0G 8.2pF 25V ±0.1pF", Manufacturer=Murata, Max Operating Temp=125°C, Min Operating Temp=-55°C, Package=0201, Rating=25V, Tolerance=0.1pF, Manufacturer PN=GJM0335C1E8R2BB01, Material=C0G, Mount=SMD, RoHS=Compliant, SubCategory Tag=Ceramic
C2: library part CMP-000-00022-A.04, "Placeholder for 0201 Capacitors", Additional Search Tag=Surface, Mount=N/A, SubCategory Tag=PLACEHOLDER
C3 C10 C19 C22 C30 C31 C39 C40 C44 C46: library part CMP-120-00154-A.04, Max Operating Temp=85°C, Min Operating Temp=-55°C, Package=0201, Rating=16V, Tolerance=20%, Material=X5R, Mount=SMD, RoHS=Compliant, SubCategory Tag=Ceramic
C4 C11 C12 C13 C20 C27 C28 C32 C33 C34 C35 C36 C37 C38 C42 C200 C207 C208: library part CMP-120-00007-B.06, Max Operating Temp=85°C, Min Operating Temp=-55°C, Package=0201, Rating=16V, Tolerance=10%, Material=X5R, Mount=SMD, RoHS=Compliant, SubCategory Tag=Ceramic
C5: "CAP CER 0201 C0G 0.7pF 50V ±0.05pF", Manufacturer=Murata, Manufacturer Part Number=GJM0335C1HR70WB01D, Manufacturer PN=GJM0335C1HR70WB01, Max Operating Temp=125°C, Min Operating Temp=-55°C, Package=0201, Rating=50V, Tolerance=0.05pF, Component Type=Capacitors, Material=C0G, Mount=SMD, RoHS=Compliant, SubCategory Tag=Ceramic
C6 C7: library part CMP-120-00183-A.02, "CAP CER 0201 C0G 18pF 50V 2%", Manufacturer=Murata, Max Operating Temp=125°C, Min Operating Temp=-55°C, Package=0201, Rating=50V, Tolerance=2%, Manufacturer PN=GRM0335C1H180GA01, Material=C0G, Mount=SMD, RoHS=Compliant, SubCategory Tag=Ceramic
C17: "CAP CER 0201 C0G 0.9pF 50V ±0.05pF", Manufacturer=Murata, Manufacturer Part Number=GJM0335C1HR70WB01D, Manufacturer PN=GJM0335C1HR70WB01, Max Operating Temp=125°C, Min Operating Temp=-55°C, Package=0201, Rating=50V, Tolerance=0.05pF, Component Type=Capacitors, Material=C0G, Mount=SMD, RoHS=Compliant, SubCategory Tag=Ceramic
C21: library part CMP-120-00153-A.02, Max Operating Temp=85°C, Min Operating Temp=-55°C, Package=0201, Rating=16V, Tolerance=10%, Material=X5R, Mount=SMD, RoHS=Compliant, SubCategory Tag=Ceramic
C26 C29 C209: library part CMP-120-00151-A.01, Max Operating Temp=85°C, Min Operating Temp=-55°C, Package=0603, Rating=16V, Tolerance=10%, Material=X5R, Mount=SMD, RoHS=Compliant, SubCategory Tag=Ceramic
C43 C53: library part CMP-120-00155-A.02, Max Operating Temp=85°C, Min Operating Temp=-55°C, Package=0201, Rating=16V, Tolerance=10%, Material=X5R, Mount=SMD, RoHS=Compliant, SubCategory Tag=Ceramic
C45: library part CMP-120-00156-A.02, Max Operating Temp=85°C, Min Operating Temp=-55°C, Package=0201, Rating=10V, Tolerance=20%, Material=X5R, Mount=SMD, RoHS=Compliant, SubCategory Tag=Ceramic
C51 C52: library part CMP-120-00336-A.01, "CAP CER 0201 C0G 12pF 50V 1%", Manufacturer=Murata, Max Operating Temp=125°C, Min Operating Temp=-55°C, Package=0201, Rating=50V, Tolerance=1%, Manufacturer PN=GRM0335C1H120FA01, Material=C0G, Mount=SMD, RoHS=Compliant, SubCategory Tag=Ceramic
C201 C202 C203: library part CMP-000-00126-A.01, "Placeholder for 0402 Capacitors", Additional Search Tag=Surface, Mount=N/A, SubCategory Tag=PLACEHOLDER
C205: library part CMP-120-00019-A.02, Max Operating Temp=125°C, Min Operating Temp=-55°C, Package=0201, Rating=25V, Tolerance=0.05pF, Material=C0G, Mount=SMD, RoHS=Compliant, SubCategory Tag=Ceramic
FL1: library part CMP-143-00003-B.02, "FILTER BAND PASS 0402-4Pin 2.45GHz 100MHz", Manufacturer=Maglayers, Max Operating Temp=85°C, Min Operating Temp=-40°C, Package=0402-4Pin, Manufacturer PN=LTB-1005-2G4H6-A4-PS, Mount=SMD, RoHS=Compliant, SubCategory="Band Pass"
J1: library part CMP-125-00081-B.01, "CONN RF 50OHM UFL_2.6x2.6 SMD", Manufacturer=Hirose, Max Operating Temp=90°C, Min Operating Temp=-40°C, Package=UFL_2.6x2.6, Additional Search Tag=UFL, Manufacturer PN=U.FL-R-SMT-1, Mount=SMD, RoHS=Compliant, SubCategory Tag=Other
L1: library part CMP-155-00126-A.01, "IND Fixed 0201 3.5nH 500mA 170mOhm ±0.1nH", DC Resistance=0.17, Manufacturer=Murata, Max Operating Temp=125°C, Min Operating Temp=-55°C, Package=0201, Rating=500mA, Tolerance=0.1nH, Manufacturer PN=LQP03HQ3N5B02, Mount=SMD, RoHS=Compliant, Shielding="Not shielded", SubCategory Tag=Fixed
L3: "IND Fixed 0201 4nH 500mA 170mOhm ±0.1nH", DC Resistance=0.17, Manufacturer=Murata, Manufacturer Part Number=LQP03HQ3N5B02D, Manufacturer PN=LQP03HQ3N5B02, Max Operating Temp=125°C, Min Operating Temp=-55°C, Package=0201, Rating=500mA, Tolerance=0.1nH, Component Type=Inductors, Mount=SMD, RoHS=Compliant, Shielding="Not shielded", SubCategory Tag=Fixed
L4: library part CMP-155-00072-A.04, "IND Fixed 0201 6.2nH 400mA 250mOhm 3%", DC Resistance=0.25, Manufacturer=Murata, Max Operating Temp=125°C, Min Operating Temp=-55°C, Package=0201, Rating=400mA, Tolerance=3%, Manufacturer PN=LQP03HQ6N2H02, Mount=SMD, RoHS=Compliant, Shielding="Not shielded", SubCategory Tag=Fixed
L5: library part CMP-155-00035-A.07, "IND Fixed 0805 1uH 2A 95mOhm 20%", DC Resistance=95m, Manufacturer=Murata, Max Operating Temp=125°C, Min Operating Temp=-40°C, Package=0805, Rating=2A, Tolerance=20%, Manufacturer PN=DFE201210U-1R0M#, Mount=SMD, RoHS=Compliant, Shielding=Shielded, SubCategory Tag=Fixed
LOGO1: library part CMP-000-00112-A.01, "Silkscreen logo, Silabs logo and text, B: 12MM, H:6MM", Additional Search Tag=Surface, Mount=N/A, SubCategory Tag=GRAPH
M1: library part CMP-000-00032-A.04, "Subset of testpoints and keepouts for production test of Radio Boards", Additional Search Tag=Surface, Mount=N/A, SubCategory Tag=TP
MARK1: library part CMP-000-00011-A.03, "Silkscreen logo, RoHS, 5MM", Additional Search Tag=Surface, Mount=N/A, SubCategory Tag=GRAPH
MARK2: library part CMP-000-00009-A.07, "Silkscreen logo, ESD, 4.5MM", Additional Search Tag=Surface, Mount=N/A, SubCategory Tag=GRAPH
MARK3: library part CMP-000-00010-A.06, "Silkscreen logo, lead free, 2MM", Additional Search Tag=Surface, Mount=N/A, SubCategory Tag=GRAPH
MARK4: library part CMP-000-00021-A.03, "Board info frame 19MM x 6MM, Silkscreen", Additional Search Tag=Surface, Mount=N/A, SubCategory Tag=GRAPH
P200 P201: library part CMP-125-00164-A.12, "SOCKET 2X20 1.27MM SMD VRT KEYED", Manufacturer=WCON, Max Operating Temp=105°C, Min Operating Temp=-40°C, Package="HDR 2X20 1.27MM", Additional Search Tag=Female, Manufacturer PN=2344-220MS3CUNR8, Mount=SMD, No of Positions=40, No of Rows=2, Note="Samtec footprint made as default as used for radio boards", RoHS=Compliant, SubCategory Tag="Header 1.27mm"
R2 R200: library part CMP-180-00002-A.10, Max Operating Temp=125°C, Min Operating Temp=-55°C, Package=0201, Rating=50mW, Tolerance=1%, Mount=SMD, RoHS=Compliant, SubCategory Tag="Thick Film"
R6: library part CMP-180-00277-A.01, Max Operating Temp=155°C, Min Operating Temp=-55°C, Package=0201, Rating=50mW, Tolerance=1%, Mount=SMD, RoHS=Compliant, SubCategory Tag="Thick Film"
R12: library part CMP-180-00000-A.10, Max Operating Temp=125°C, Min Operating Temp=-55°C, Package=0201, Rating=50mW, Tolerance=1%, Mount=SMD, RoHS=Compliant, SubCategory Tag="Thick Film"
R100: library part CMP-180-00121-A.01, Max Operating Temp=155°C, Min Operating Temp=-55°C, Package=0201, Rating=50mW, Tolerance=1%, Mount=SMD, RoHS=Compliant, SubCategory Tag="Thick Film"
R201 R202 R204 R205 R208 R209 R210 R219 R220 R221: library part CMP-180-00061-B.02, Max Operating Temp=155°C, Min Operating Temp=-55°C, Package=0402, Rating=62.5mW, Tolerance=0%, Mount=SMD, RoHS=Compliant, SubCategory Tag="Thick Film"
R206 R207 R212 R224: library part CMP-180-00045-B.02, "RES 0402 0R 1/16W 1% 200ppm", Manufacturer=Yageo, Max Operating Temp=155°C, Min Operating Temp=-55°C, Package=0402, Rating=63mW, Tolerance=1%, Manufacturer PN=RC0402FR-070RL, Mount=SMD, RoHS=Compliant, SubCategory Tag="Thick Film"
SH1: library part CMP-473-00000-A.08, "SHIELD FRAME 21x21x3 STEEL 0.5", Manufacturer="Würth Elektronik", Max Operating Temp=125°C, Min Operating Temp=-40°C, Manufacturer PN=36103205, Material=STEEL, Mount=SMD, RoHS=Compliant, SubCategory Tag=FRAME
TP2 TP3 TP5 TP6 TP7: library part CMP-000-00001-A.11, Additional Search Tag=Surface, Mount=N/A, SubCategory Tag="TEST POINT"
U1: library part CMP-150-00167-C.02, "IC SoC 32BIT 8MB FLASH QFN84 2.4GHz Single Band Wi-Fi", Manufacturer="Silicon Labs", Max Operating Temp=85°C, Min Operating Temp=-40°C, Package=QFN84, Voltage=3.63V, Additional Search Tag="SoC Wireless", Manufacturer PN=SiWG917M111MGTBAR, Mount=SMD, RoHS=Compliant, SubCategory Tag=Embedded
U2: library part CMP-150-00062-B.04, "IC RF SWITCH SP3T 6GHz USON8L", Manufacturer=Hexawave, Max Operating Temp=85°C, Min Operating Temp=-40°C, Package=8-USON, Voltage=6V, Additional Search Tag="RF Switches", Manufacturer PN=HWS520, Mount=SMD, Note="Alternate footprint has bottom SM opening as per request", RoHS=Compliant, SubCategory Tag=Interface
U200: library part CMP-150-00051-B.01, "IC EEPROM 2KBIT I2C UFDFPN8", Manufacturer="ST Microelectronics", Max Operating Temp=85°C, Min Operating Temp=-40°C, Package=UFDFPN8, Voltage=5.5V, Additional Search Tag=EEPROM, Manufacturer PN=M24C02-FMC6TG, Mount=SMD, RoHS=Compliant, SubCategory Tag=Memory
Y1: library part CMP-130-00017-A.04, "CRYSTAL 2.0X1.6mm 40MHz 8pF 8ppm", Manufacturer=TXC, Max Operating Temp=105°C, Min Operating Temp=-40°C, Package=2.0X1.6mm, Tolerance=8ppm, Manufacturer PN=8Y40070013, Mount=SMD, RoHS=Compliant, SubCategory Tag=XTAL
Y2: library part CMP-130-00007-A.02, "CRYSTAL 2.0x1.2mm 32.768kHz 7pF 20ppm", Manufacturer="Micro Crystal", Max Operating Temp=85°C, Min Operating Temp=-40°C, Package=2.0x1.2mm, Tolerance=20ppm, Manufacturer PN=CM8V-T1A-32.768KHZ-7PF-20PPM-TA-QC, Mount=SMD, RoHS=Compliant, SubCategory Tag=XTAL

## Via types
v1: diameter 0.5, hole 0.2, Top Layer to Bottom Layer, tented both sides, 372 vias
v2: diameter 0.5/0.5/0.5/0.5 (per signal layer), hole 0.2, Top Layer to Bottom Layer, tented both sides, 41 vias

## Nets (pads, with @x,y where several pads share a name; then routed paths per layer and width w, separated by ;. In a path a pad name is that pad's centre, name@x,y a point inside that pad or via, vN(x,y) a via of type N, cw(c..) or ccw(c..) an arc to the next point about the centre after c; other vN are vias at no path point)
3V3: C200.1 M1.TPJ10 P200.1 R200.2 U200.1 U200.8 | length 54.6
  Signal Layer 3 w0.254: v1(2.49,28.705) 2.448,28.747 2.448,31.798 4.3,33.65 25.1,33.65 27.05,31.7 27.05,28.65 28.6,27.1 28.6,20.888 28.741,20.746 v1(28.741,20.68)
  Bottom Layer w0.254: v1(2.49,28.705) 2.537,28.658 2.537,28.578 2.935,28.18 P200.1@2.935,27.55 ; M1.TPJ10@24.597,17.356 M1.TPJ10@24.702,17.251 ; M1.TPJ10@24.726,17.226 24.702,17.202 24.702,16.298 25.5,15.5 26.275,15.5 26.825,14.95 27.3,14.95 27.727,15.377 27.727,16.127 U200.1@27.75,16.15 28.2,16.15 28.5,16.45 28.5,18.5 28.132,18.868 27.773,18.868 27.75,18.891 U200.8@27.75,18.95 27.738,18.962 27.738,19.988 C200.1@27.725,20 ; C200.1@27.721,20.004 27.738,20.021 27.738,20.638 27.765,20.665 28.726,20.665 v1(28.741,20.68)
5V_IN: M1.TPJ12 P200.37 | length 2.4
  Bottom Layer w0.1: M1.TPJ12@25.15,25.5 25.249,25.5 25.795,26.046 P200.37@25.795,27.55
BOARD_ID_SCL: M1.TPJ14 P200.39 U200.6 | length 9.7
  Bottom Layer w0.1: U200.6@26.7,19.05 26.7,19.15 26.456,19.394 26.444,19.394 25.638,20.2 M1.TPJ14@25.601,20.2 25.601,21.882 26.723,23.005 26.723,26.565 27.1,26.942 P200.39@27.1,27.65
BOARD_ID_SDA: M1.TPJ15 P200.40 U200.5 | length 13.5
  Bottom Layer w0.1: M1.TPJ15@25.601,22.801 25.601,22.558 25.35,22.307 25.35,20.869 24.951,20.469 24.951,19.931 25.932,18.95 U200.5@26.25,18.95 ; M1.TPJ15@25.601,22.801 26.201,22.801 26.45,23.05 26.45,29.205 27.065,29.82 P200.40@27.065,30.45
BOARD_ID_WP: M1.TPJ16 R200.1 U200.7 | length 18.9
  Signal Layer 3 w0.1: v1(26.75,20.65) 26.293,20.193 26.293,18.907 27.55,17.65 27.55,10.008 27.4,9.858 v1(27.4,9.75)
  Bottom Layer w0.1: M1.TPJ16@23.551,8.751 23.576,8.776 26.576,8.776 27.292,9.492 27.292,9.534 27.4,9.642 v1(27.4,9.75) ; R200.1@27.15,20.65 v1(26.75,20.65) 26.7,20.65 26.293,20.243 26.293,19.828 26.527,19.594 26.54,19.594 26.617,19.517 26.833,19.517 27.25,19.1 U200.7@27.25,18.95
GND: ANT1.2 C2.2 C3.1 C4.1 C5.1 C10.1 C11.1 C12.1 C13.1 C17.1 C19.1 C20.1 C21.1 C22.1 C26.1 C27.1 C28.1 C29.1 C30.1 C31.1 C32.1 C33.1 C34.1 C35.1 C36.1 C37.1 C38.1 C39.1 C40.1 C42.1 C44.1 C45.1 C46.1 C51.1 C52.1 C53.1 C200.2 C202.1 C203.1 C205.1 C207.1 C208.1 C209.2 FL1.2 FL1.4 J1.2 J1.3 M1.TPJ13 P200.2 P200.38 P201.1 P201.39 R100.2 SH1.1 SH1.2 SH1.3 SH1.4 SH1.5 SH1.6 SH1.7 SH1.8 SH1.9 SH1.10 SH1.11 SH1.12 U1.A15 U1.B41 U2.9 U200.2 U200.3 U200.4 U200.9 Y1.2 Y1.4 | length 49.5
  Top Layer w0.083: U1.A15@9.925,16.5 v1(11.25,16.5)
  Top Layer w0.127: v1@4.113,16.287 4.177,16.35 v1(4.177,16.362) ; v1(4.25,18.55) 3.9,18.2 3.9,16.798 4.106,16.592 4.106,16.333 4.513,15.925 6.875,15.925 7,16.05 7,16.546 7.079,16.625 7.079,16.979 v1(7.15,17.05) ; v1@4.25,18.6 4.3,18.6 4.95,19.25 6.549,19.25 7.2,18.599 v1(7.2,18.1)
  Top Layer w0.2: v2(7.05,19.75) 7.05,19.68 7.23,19.5 C3.1@7.25,19.5 ; v2(7.3,13.91) 7.345,13.955 7.68,13.955 C35.1@7.725,14 ; v2(7.8,19) 7.825,18.975 8.325,18.975 C4.1@8.35,18.95 ; v2(7.85,17.05) 7.875,17.075 8.3,17.075 C12.1@8.325,17.1 ; v2(7.9,16.184) 7.933,16.217 8.292,16.217 C22.1@8.325,16.25 ; C205.1@8.5,20.275 v2(8.5,20.75) ; v2(10.802,9.094) 10.802,9.175 10.94,9.313 10.94,9.465 C40.1@11,9.525 ; v2(12.55,9.95) 12.575,9.925 12.85,9.925 C52.1@12.875,9.9 ; C20.1@12.9,20.85 12.933,20.883 12.933,21.223 v2(12.94,21.23) ; C19.1@13.2,22.575 v2(13.2,22.95) ; C51.1@14.825,9.9 14.848,9.923 15.137,9.923 v2(15.16,9.946) ; C37.1@17.325,20.85 17.375,20.9 17.65,20.9 v2(17.7,20.95) ; C31.1@18.025,12.05 18.05,12.025 18.325,12.025 v2(18.35,12) ; C39.1@18.025,12.8 18.041,12.816 18.559,12.816 v2(18.575,12.833) ; C30.1@18.025,13.7 18.045,13.7 18.213,13.868 18.298,13.868 v2(18.355,13.925) ; C33.1@18.175,17.3 18.214,17.339 18.511,17.339 v2(18.55,17.378) ; C27.1@18.275,14.7 18.287,14.688 18.688,14.688 v2(18.7,14.676) ; C46.1@18.375,15.35 18.396,15.371 19.029,15.371 v2(19.05,15.391) ; C38.1@18.525,19 18.817,19 18.894,19.077 v2(18.975,19.077) ; v2(19.673,8.223) 19.685,8.211 20.113,8.211 C10.1@20.125,8.2
  Top Layer w0.25: v2@7.65,15.65 C42.1@8.05,15.65 ; v2(7.9,18.131) 7.968,18.131 8.052,18.215 8.27,18.215 8.3,18.245 C13.1@8.3,18.25 ; v1(11.975,25.3) FL1.4@12.45,25.3 ; v2(12.013,10.218) 12.061,10.266 12.061,10.366 12.195,10.5 C21.1@12.2,10.5 ; FL1.2@13,25.3 v1(13.475,25.3) ; v2(13.7,21.7) 13.725,21.675 13.725,21.375 C11.1@13.75,21.35 ; C28.1@16.1,10.525 16.135,10.49 16.135,10.333 16.2,10.268 v2(16.2,10.2) ; C36.1@16.675,19.55 16.7,19.525 17.075,19.525 v2(17.1,19.5) ; C34.1@16.925,20.15 16.96,20.115 17.306,20.115 v2(17.35,20.071)
  Top Layer w0.254: C45.1@10.45,10.625 10.465,10.61 10.465,10.217 v2(10.479,10.202) ; v2(13.191,10.381) 13.258,10.381 13.324,10.447 13.342,10.447 13.45,10.555 C44.1@13.45,10.575 ; C32.1@16.7,10.525 16.733,10.492 16.733,10.35 16.831,10.252 v2@16.831,10.185
  Top Layer w0.3: v2(11.126,21.646) 11.162,21.61 11.515,21.61 C2.2@11.525,21.6 11.522,21.6 11.512,21.61 11.512,21.963 v2(11.5,21.975)
  Top Layer w0.4: v2(4.5,17) 4.527,17 4.577,16.95 5,16.95 Y1.2@5.1,16.85 ; v2(6.15,18.7) 6.169,18.681 6.169,18.131 Y1.4@6.2,18.1
  Top Layer w0.5: v1(9.4,7.8) v1(9.9,7.8) ; v2(10,23.425) v2(11.5,23.425) ; v2(11.126,21.646) 11.455,21.975 v2(11.5,21.975) ; v2(17.75,8.3) v2(17.75,9.55) ; C29.1@18.55,9.05 18.45,8.95 v2(18.45,8.25) v2(18.95,8.25) 18.75,8.45 C29.1@18.75,8.9 ; v1@18.95,10.15 v1(18.95,10.6) v1(18.95,11.1)
  Top Layer w1: v1(8.8,34.3) 8.839,34.339 ANT1.2@8.839,35.288
  Bottom Layer w0.2: v1(1.5,8.9) 1.512,8.912 1.512,9.287 C207.1@1.525,9.3 ; v2@15.15,9.95 15.155,9.955 15.155,10.52 C53.1@15.15,10.525
  Bottom Layer w0.254: v1(8.35,9.1) 8.35,9.105 8.6,9.355 C208.1@8.6,9.375 ; v1(25.75,16.216) 25.783,16.183 26.227,16.183 26.25,16.16 U200.4@26.25,16.15 ; v1(26.693,19.994) 26.696,19.997 27.172,19.997 C200.2@27.175,20 ; U200.3@26.75,16.15 26.773,16.127 26.773,15.627 v1@26.9,15.5 ; v1@27.2,15.55 27.25,15.6 U200.2@27.25,16.15
  Bottom Layer w0.5: v1(2.925,2.375) 2.925,3.54 P201.1@2.935,3.55 2.925,3.56 v1(2.925,4.675) ; v1(2.925,29.275) 2.925,30.44 P200.2@2.935,30.45 2.925,30.46 v1(2.925,31.6) ; v1(9.4,7.8) v1(9.9,7.8) ; v1(25.8,31.575) 25.8,30.455 P200.38@25.795,30.45 25.825,30.42 v1(25.825,29.275) ; v1(27,4.7) 27,3.615 P201.39@27.065,3.55 27.05,3.535 v1(27.05,2.35)
  other v1: 11.7,0.75 13.1,0.75 14.5,0.75 1.9,0.8 3.3,0.8 4.7,0.8 6.1,0.8 7.5,0.8 8.9,0.8 10.3,0.8 15.9,0.8 17.3,0.8 18.7,0.8 20.1,0.8 21.5,0.8 22.9,0.8 24.3,0.8 25.7,0.8 27.1,0.8 28.5,0.8 0.9,1 29.2,1.5 16.4,1.6 27.9,1.6 20.1,1.9 17.8,2.15 0.778,2.25 6.1,2.25 14.95,2.3 8.65,2.35 11.2,2.35 29.2,2.7 0.778,3.75 29.2,3.9 4.9,5 6.2,5 15.4,5 20.05,5 8.433,5.033 0.8,6.1 29.2,6.1 0.8,7.5 29.2,7.5 3.6,7.8 22.115,7.909 15.5,8 6.1,8.05 12.15,8.05 16.4,8.05 25.3,8.05 0.8,8.9 29.2,8.9 27.4,9 11.95,9.05 5,9.25 22.2,9.65 18.95,10.12 0.8,10.3 29.2,10.3 7.15,11 23.05,11.55 27.1,11.6 0.8,11.7 29.2,11.7 20.7,11.75 0.8,13.1 29.2,13.1 11.25,13.5 12.25,13.5 13.25,13.5 14.25,13.5 15.25,13.5 22.3,13.6 27.15,13.95 3.8,14.05 0.8,14.5 11.25,14.5 12.25,14.5 13.25,14.5 14.25,14.5 15.25,14.5 29.2,14.5 23.189,14.955 27.05,15.45 11.25,15.5 12.25,15.5 13.25,15.5 14.25,15.5 15.25,15.5 0.8,15.9 29.2,15.9 12.25,16.5 13.25,16.5 0.8,17.3 29.2,17.3 23.7,17.4 11.25,17.5 12.25,17.5 13.25,17.5 25.75,17.75 0.8,18.7 29.2,18.7 9.55,19.05 24.55,19.4 11.423,19.604 0.8,20.1 29.2,20.1 4.45,20.3 11.45,20.3 9.6,20.9 18.35,21.05 24.8,21.35 0.8,21.5 29.2,21.5 9.6,21.625 8.5,21.65 26.6,21.75 12.65,22.1 9.6,22.3 8.5,22.55 6.8,22.75 4.5,22.8 0.8,22.9 21.8,22.9 29.2,22.9 9.6,22.95 12.101,23.326 23.65,23.35 8.55,23.45 12.826,23.551 14.173,23.75 27.95,23.85 7.7,23.95 6.55,24.2 8.875,24.225 0.8,24.3 29.2,24.3 16.4,24.85 4.45,25.05 5.9,25.25 10.7,25.35 9.35,25.4 14.7,25.45 0.8,25.7 16.9,25.7 26.05,25.7 29.2,25.7 11.8,25.9 6.75,26 8,26 24.4,26.1 0.8,26.9 29.2,26.9 28,27 0.8,27.9 29.2,27.9 11.4,29 13.375,29 16.323,29.033 5.05,29.05 19.4,29.05 27.85,29.95 0.8,30.1 29.2,30.1 0.8,31.5 29.2,31.5 27.9,31.65 15,31.7 10.6,31.8 19.4,31.8 13.45,31.85 21.5,31.9 9.95,32.15 7.35,32.2 20.45,32.7 0.8,32.9 29.2,32.9 24.95,32.95 2.7,33 15.05,33.05 11.9,33.1 8.7,33.15 13.5,33.15 19.4,33.15 26.95,33.2 0.8,34.3 1.9,34.3 2.9,34.3 3.95,34.3 6.9,34.3 7.8,34.3 9.8,34.3 10.8,34.3 11.9,34.3 14.2,34.3 15.3,34.3 16.4,34.3 19,34.3 20.3,34.3 21.6,34.3 24.6,34.3 25.7,34.3 26.8,34.3 28,34.3 29.2,34.3
  other v2: 16.832,10.185 7.68,15.62 11.45,21.057
IO_VDD_3: C38.2 R220.2 R221.2 U1.B1 | length 15.1
  Top Layer w0.203: U1.B1@15.5,18.325 15.5,18.377 15.523,18.4 16.89,18.4 17.49,19 17.896,19 17.9,18.996 C38.2@17.9,18.95 ; C38.2@17.975,19 17.995,19 18.053,19.058 18.053,19.253 18.311,19.511 18.884,19.511 19.033,19.661 v1(19.113,19.661)
  Signal Layer 3 w0.203: v1@19.1,19.65 19.124,19.65 19.601,19.173 19.601,16.477 20.201,15.877 20.201,14.345 19.806,13.95 19.806,11.923 20.79,10.939 21.161,10.939 v1(21.2,10.9)
  Bottom Layer w0.203: R220.2@20.6,10.85 20.625,10.875 21.175,10.875 v1(21.2,10.9)
NetANT1_1: ANT1.1 C201.2 C203.2 | length 1.7
  Top Layer w0.29: C201.2@12.725,33.55 C203.2@12.725,34.3
  Top Layer w0.3: C203.2@12.725,34.3 ANT1.1@12.725,35.285
NetBTN100_1: BTN100.1 BTN100.2 R100.1 | length 5.8
  Top Layer w0.127: R100.1@20.35,4.05 21.85,4.05 BTN100.1@21.9,4.1 ; BTN100.1@21.925,4.075 BTN100.2@26.075,4.075 26.125,4.075 BTN100.2@26.15,4.05
NetC1_1: C1.1 C2.1 L1.2 | length 1.2
  Top Layer w0.29: C2.1@12.075,21.6 12.088,21.587 12.088,21.057 L1.2@12.1,21.045 ; C2.1@12.088,21.6 12.088,22.187 C1.1@12.1,22.2
NetC1_2: C1.2 U2.8 | length 0.7
  Top Layer w0.29: U2.8@11.395,22.725 12.085,22.725 12.1,22.74 C1.2@12.1,22.75
NetC3_2: C3.2 C4.2 R207.2 U1.A12 | length 3.6
  Top Layer w0.24: R207.2@7.7,20.25 7.75,20.2 C3.2@7.75,19.5 ; C3.2@7.85,19.47 7.86,19.46 8.09,19.46 8.22,19.33 8.674,19.33 8.815,19.189 8.815,18.99 8.855,18.95 C4.2@8.875,18.95 8.915,18.91 8.94,18.91 9.85,18 U1.A12@9.925,18
NetC5_2: C5.2 L1.1 U1.A9 | length 1.8
  Top Layer w0.25: U1.A9@11.75,18.825 ccw(c11.5,18.841) 11.75,18.84 11.75,19.194 cw(c12,19.194) 11.824,19.371 11.952,19.499 ccw(c11.775,19.676) 12.025,19.676 C5.2@12.025,19.85 ; C5.2@12.02,19.915 12.055,19.95 C5.2@12.075,19.95
  Top Layer w0.254: C5.2@12.075,19.95 12.088,19.963 12.088,20.493 L1.1@12.1,20.505
NetC6_1: C6.1 U2.1 | length 0.8
  Top Layer w0.29: U2.1@11.395,24.15 C6.1@12.175,24.15
NetC6_2: C6.2 FL1.1 | length 0.6
  Top Layer w0.29: C6.2@12.725,24.15 FL1.1@12.725,24.775
NetC7_1: C7.1 FL1.3 | length 2.5
  Top Layer w0.29: FL1.3@12.725,25.82 C7.1@12.725,28.35
NetC7_2: C7.2 R201.1 R202.1 | length 1.1
  Top Layer w0.29: C7.2@12.725,28.9 R202.1@12.725,29.95
NetC9_1: C9.1 C17.2 L3.2 | length 1.3
  Top Layer w0.29: C9.1@10.15,20.975 ccw(c10.425,20.975) 10.425,20.7 C17.2@10.8,20.7 ; L3.2@10.8,20.12 C17.2@10.8,20.65
NetC9_2: C9.2 U2.5 | length 1.2
  Top Layer w0.2: 10.15,22.05 U2.5@10.15,22.725
  Top Layer w0.29: C9.2@10.15,21.525 10.15,22.037
NetC11_2: C11.2 R206.2 U1.A8 | length 5.2
  Top Layer w0.15: U1.A8@12.25,18.825 12.3,18.875 12.3,19.158 13.691,20.549 13.691,20.766 C11.2@13.75,20.825
  Top Layer w0.203: C11.2@13.75,20.825 13.75,20.845 13.808,20.903 14.008,20.903 14.802,21.698 14.802,22.848 R206.2@14.8,22.85
NetC12_2: C12.2 R212.2 U1.A14 | length 4
  Top Layer w0.2: R212.2@6.85,15.45 7.05,15.65 7.099,15.65 7.467,16.018 7.467,16.363 7.721,16.617 8.545,16.617 8.795,16.867 8.795,17.04 8.855,17.1 C12.2@8.875,17.1 ; C12.2@9.045,17 10,17 U1.A14@9.925,17
NetC13_2: C13.2 R224.2 U1.B11 | length 5.7
  Top Layer w0.083: 9.5,17.85 9.6,17.75 U1.B11@10.425,17.75
  Top Layer w0.203: R224.2@6.8,20.55 6.602,20.352 6.602,20.082 6.6,20.081 6.6,19.55 7.584,18.566 7.98,18.566 8.009,18.594 8.678,18.594 8.797,18.476 8.797,18.308 C13.2@8.855,18.25 ; C13.2@8.875,18.25 8.934,18.192 9.148,18.192 9.489,17.85
NetC18_1: C18.1 L4.2 U1.A11 | length 1.5
  Top Layer w0.29: C18.1@10.025,20.15 cw(c9.723,19.848) 10.15,19.848 L4.2@10.15,19.75 ; L4.2@10.17,19.6 10.17,19.405 ccw(c10.7,19.405) U1.A11@10.7,18.875
NetC18_2: C18.2 U2.4 | length 4.8
  Top Layer w0.29: C18.2@9.46,20.165 9.44,20.165 9.458,20.165 cw(c9.46,20.575) 9.05,20.575 9.05,23.175 cw(c10.025,23.175) 10.025,24.15
NetC43_1: C43.1 U1.B28 | length 1.9
  Top Layer w0.083: U1.B28@14.5,12.675 14.5,11.923 14.65,11.774 14.65,11.483 14.869,11.264 15.032,11.264 15.15,11.145 C43.1@15.15,11.125
NetC43_2: C43.2 U1.A32 | length 1.9
  Top Layer w0.09: C43.2@15.15,10.575 C43.2@15.15,10.595 ; C43.2@15.15,10.6 15.25,10.7 15.35,10.7 15.438,10.788 15.438,11.862 15.33,11.97 15.33,12.095 U1.A32@15.25,12.175
NetC44_2: C44.2 TP7.1 U1.A28 | length 1.8
  Top Layer w0.127: U1.A28@13.25,12.175 13.311,12.114 13.311,11.563 v1(13.374,11.5)
  Top Layer w0.2: v1(13.374,11.5) 13.412,11.462 13.412,11.163 C44.2@13.45,11.125
  Bottom Layer w0.127: v1(13.374,11.5) 13.374,11.562 13.75,11.938 TP7.1@13.75,12
NetC45_2: C45.2 TP6.1 U1.B23 | length 5.9
  Top Layer w0.083: 11.35,11.2 11.35,11.222 11.35,11.283 11.427,11.361 11.517,11.45 ; 11.517,11.388 11.517,11.45 ; U1.B23@12,12.675 12,11.827 11.951,11.778 11.845,11.778 11.517,11.45
  Top Layer w0.2: v1(9.394,11.056) 9.452,11.113 10.39,11.113 10.45,11.173 C45.2@10.45,11.175 11.303,11.175 11.339,11.211 ; 11.35,11.222 11.458,11.33
  Bottom Layer w0.127: v1(9.394,11.056) 9.475,11.056 9.809,11.39 TP6.1@11.098,11.39
NetC46_2: C46.2 TP5.1 U1.B34 | length 7.3
  Top Layer w0.083: U1.B34@16.075,14.75 16.9,14.75 16.975,14.825
  Top Layer w0.15: 16.975,14.825 17.388,15.238 17.388,15.265 17.64,15.265 17.74,15.265 C46.2@17.825,15.35 17.845,15.35 17.93,15.435 17.93,15.562 18.036,15.668 18.714,15.668 18.845,15.799 19.278,15.799 19.377,15.7 21.473,15.7 v1(21.762,15.412)
  Bottom Layer w0.15: TP5.1@21.25,16.1 21.25,16.018 21.762,15.506 v1(21.762,15.412)
NetC51_2: C51.2 U1.A29 Y2.2 | length 3.8
  Top Layer w0.083: U1.A29@13.75,12.175 13.75,11.889 13.916,11.723 13.916,10.259 14.137,10.038 14.137,10.018 14.255,9.9 C51.2@14.275,9.9 ; C51.2@14.347,9.828 14.347,8.902 Y2.2@14.6,8.65
NetC52_2: C52.2 U1.B26 Y2.1 | length 4.3
  Top Layer w0.083: Y2.1@13.1,8.65 13.353,8.903 13.353,9.828 C52.2@13.373,9.828 ; C52.2@13.425,9.9 13.445,9.9 13.563,10.018 13.563,10.038 13.749,10.224 13.749,11.655 13.7,11.704 13.5,11.904 U1.B26@13.5,12.675
NetC201_1: C201.1 C202.2 R201.2 | length 1.7
  Top Layer w0.29: R201.2@12.725,30.85 C202.2@12.725,31.75 C201.1@12.725,32.55
NetJ1_1: J1.1 R202.2 | length 4.3
  Top Layer w0.29: R202.2@13.625,29.95 13.625,30.525 cw(c15.65,30.525) 15.65,32.55 J1.1@16.15,32.55
NetL3_1: L3.1 U1.A10 | length 0.8
  Top Layer w0.25: L3.1@10.8,19.58 11.158,19.222 cw(c10.936,19) U1.A10@11.25,19
NetR2_1: R2.1 U1.B25 | length 2.3
  Top Layer w0.083: R2.1@12.7,10.55 12.808,10.658 12.908,10.658 13,10.75 U1.B25@13,12.675
NetR6_1: R6.1 U1.B40 | length 5.5
  Top Layer w0.083: U1.B40@16.075,17.751 16.841,17.751 17.626,18.536 19.486,18.536 19.7,18.75
  Top Layer w0.1: 19.7,18.75 20.541,19.591 20.541,19.691 R6.1@20.65,19.8
NetR204_1: R204.1 R208.1 U1.A41 | length 11.9
  Top Layer w0.083: U1.A41@16.575,16.5 16.88,16.5 17.011,16.63 17.308,16.63 17.627,16.95 18.224,16.95 18.277,17.003 19.353,17.003 19.4,17.05
  Top Layer w0.1: 19.4,17.05 20.05,17.7 20.8,18.45 21.748,18.45 v1(22.65,17.548)
  Bottom Layer w0.1: R204.1@22.146,20.064 22.15,20.061 22.15,17.934 22.304,17.78 22.315,17.78 22.547,17.548 v1(22.65,17.548) ; v1@22.65,17.55 22.727,17.473 22.977,17.473 23.66,16.79 23.66,16.54 R208.1@23.85,16.35
NetR204_2: R204.2 R209.1 U1.A4 | length 12.1
  Top Layer w0.083: U1.A4@14.25,18.825 14.333,18.908 14.333,19.031 14.334,19.032 14.334,19.267 16.45,21.383 16.45,21.6
  Top Layer w0.1: 16.45,21.6 18.3,23.45 20.45,23.45 20.6,23.3 21.351,23.3 v1(21.376,23.324)
  Bottom Layer w0.1: v1(21.376,23.324) 21.4,23.3 21.4,21.711 R204.2@22.146,20.964
NetR205_1: R205.1 R210.1 U1.A1 | length 10.7
  Top Layer w0.1: U1.A1@15.75,18.825 15.75,18.792 15.825,18.717 16.875,18.717 18.208,20.05 19.8,20.05 21.78,22.03 22.2,22.45 22.2,22.734 ; v1(21.874,23.659) 21.874,23.55 22.058,23.367 22.058,23.225 22.2,23.083 22.2,22.734
  Bottom Layer w0.1: R205.1@22.7,24.5 22.7,24.495 21.943,23.738 v1@21.874,23.738 ; v1@21.874,23.738 v1(21.874,23.659) v1@21.874,23.738
NetU1_A13: U1.A13 Y1.1 | length 5.2